# Altium PCB FPC.PcbDoc
Units mm, origin at the board's own origin, x right, y up, seen from the top; angles counter-clockwise.
Board outline 110.11 x 81 mm, 2 copper layers (Top Layer, Bottom Layer), stack 0.086 mm thick; 10 components, 19 nets, 40 pads, 4 vias.
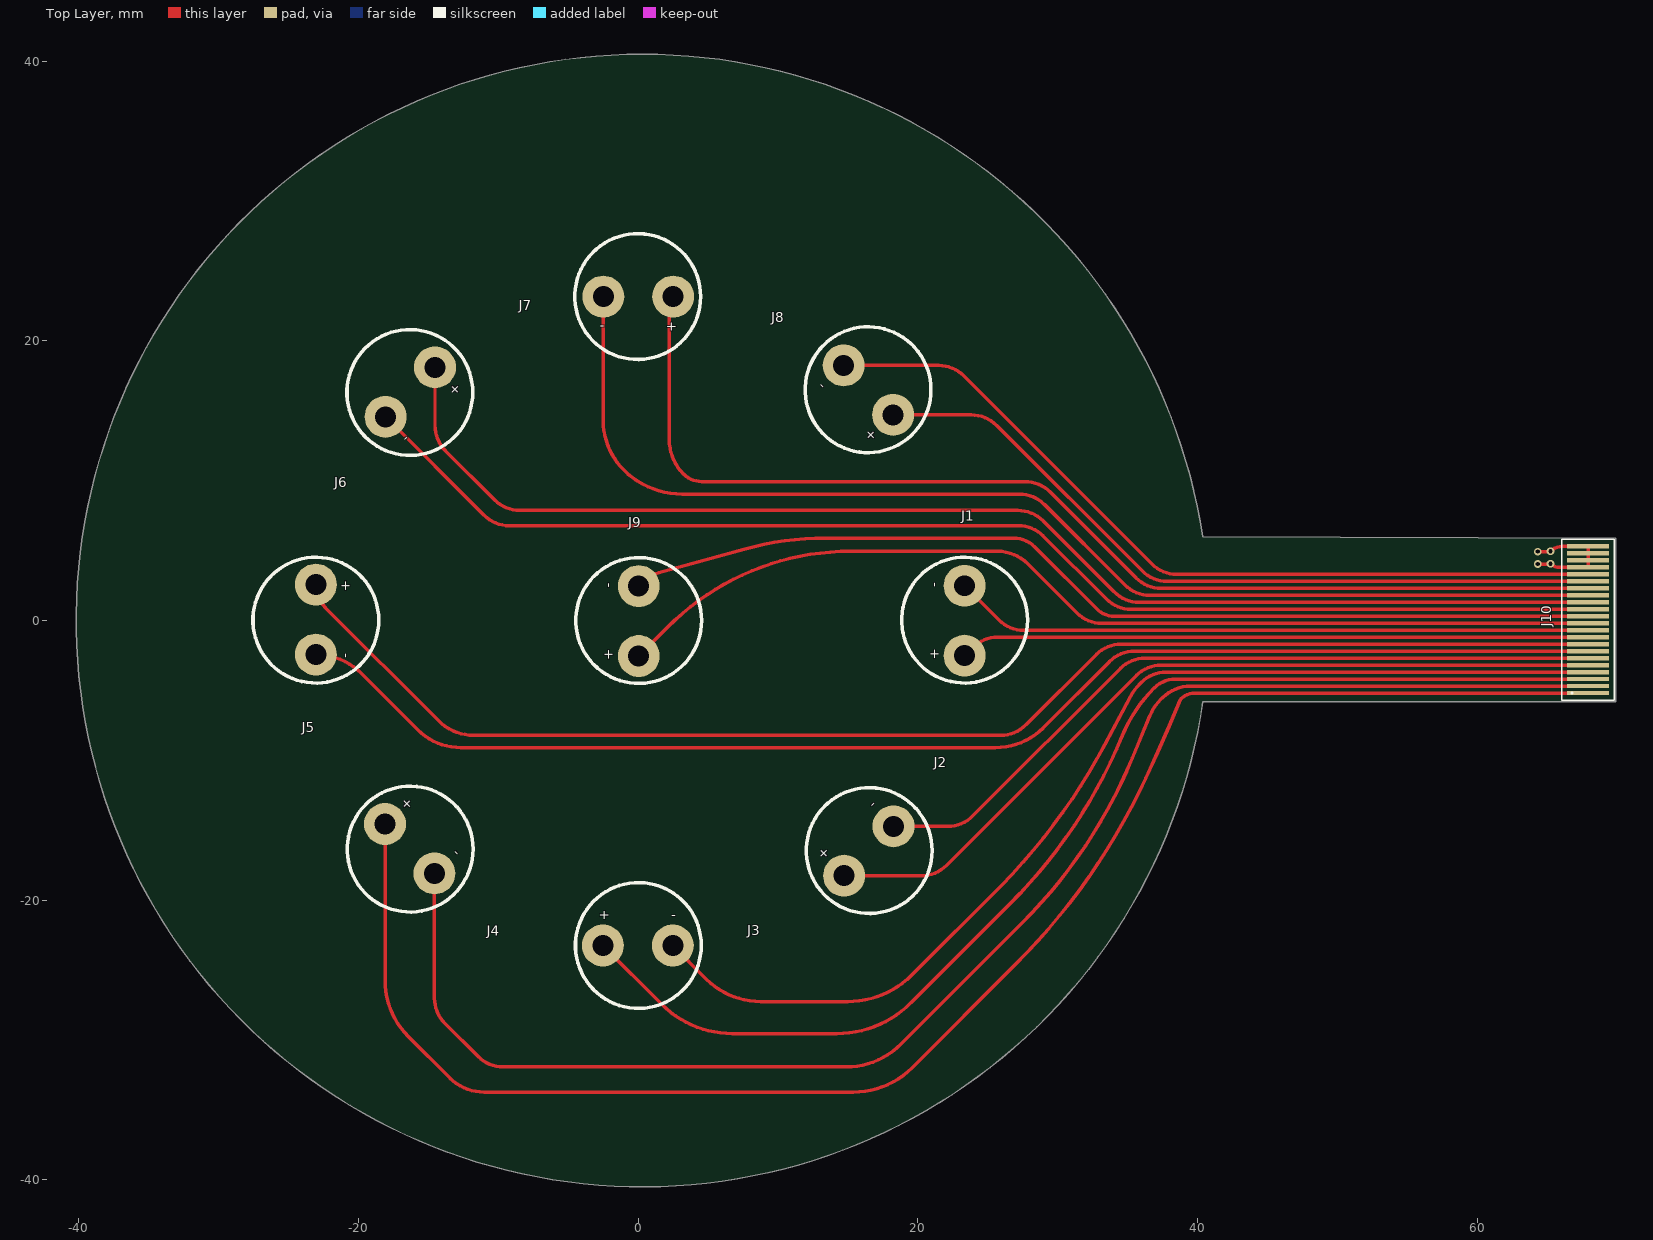
[diagram p0: Top Layer view]
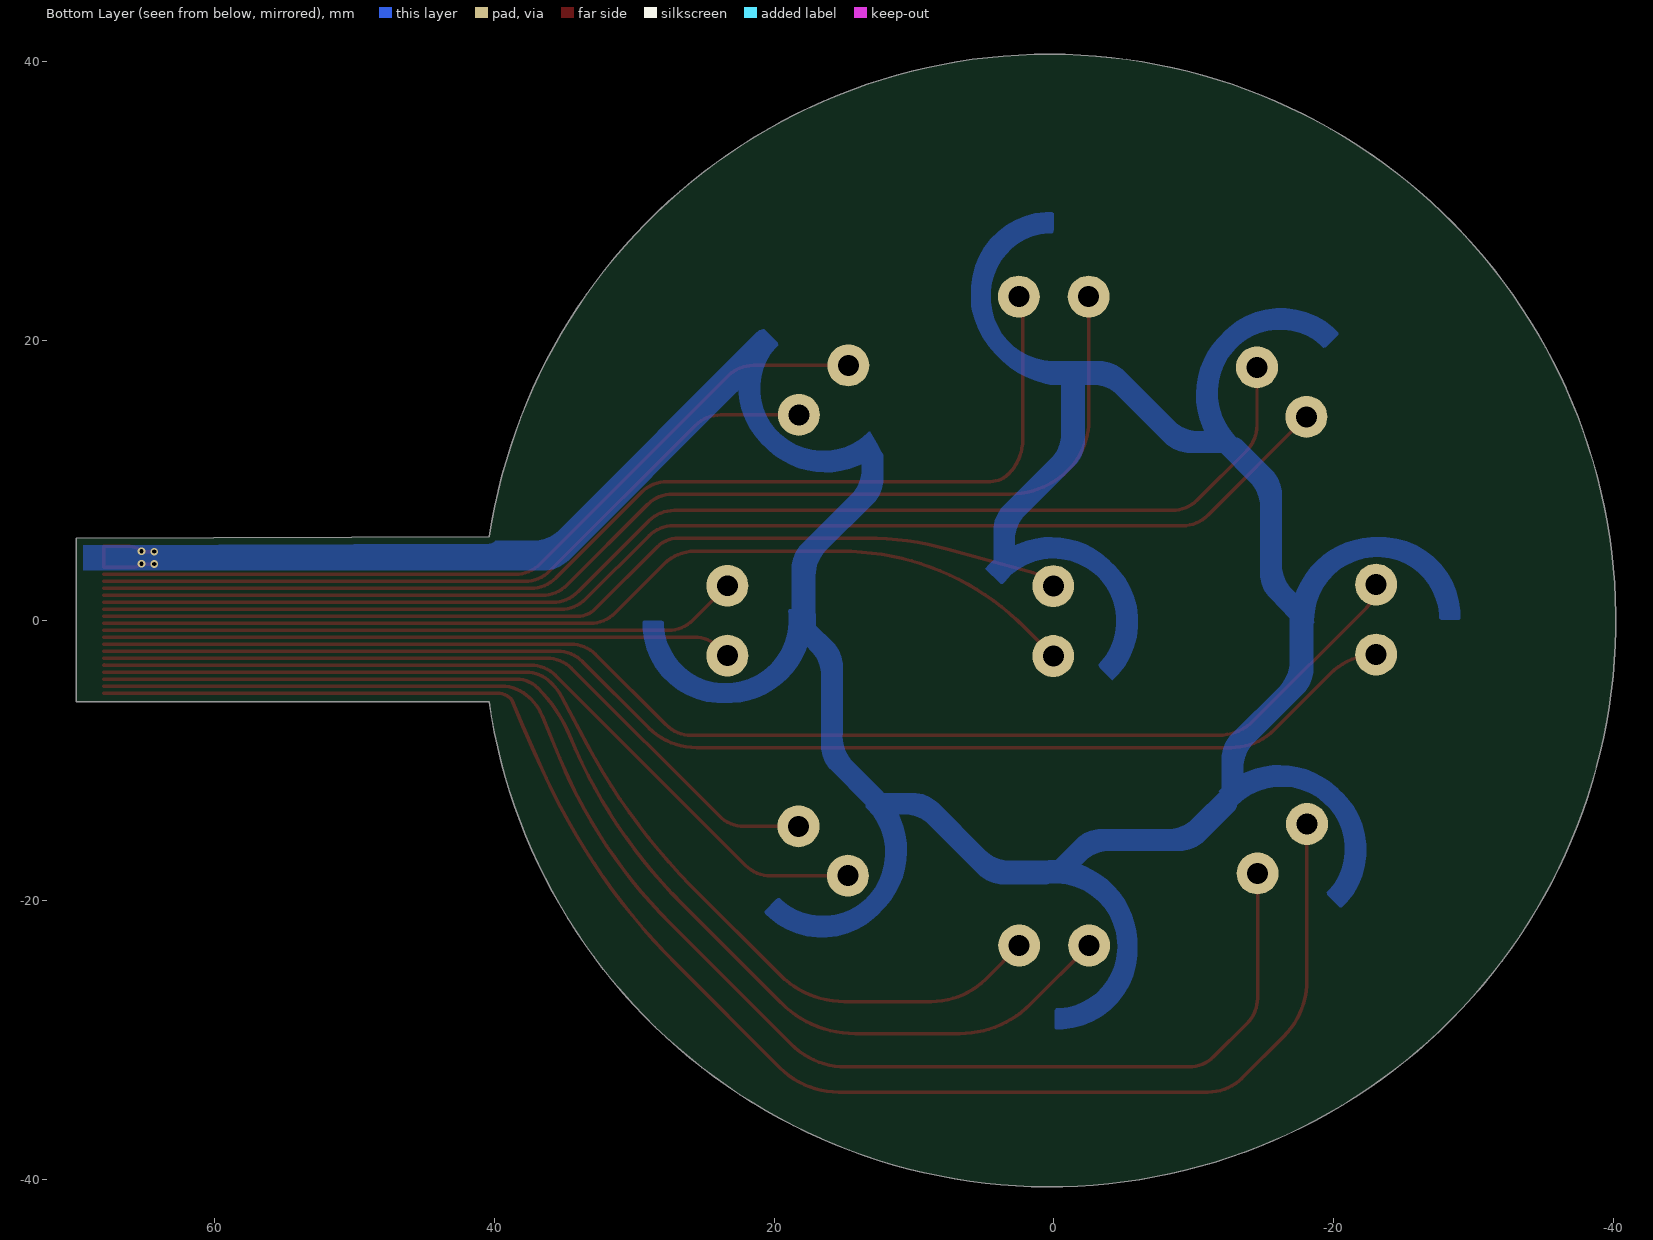
[diagram p1: Bottom Layer view, seen from below]

## Layer stack, top to bottom
Top Coverlay: solder mask 0.05, PI 25um + adhesivo 25um, Dk 3.5
Top Layer: signal copper 0.018
Dielectric 1: core 0.05, Polyimide, Dk 3.4
Bottom Layer: signal copper 0.018
Bottom Coverlay: solder mask 0.05, PI 25um + adhesivo 25um, Dk 3.5

## Board outline
40.399,-5.804 cw(c0.318,0) 40.372,5.99 69.926,5.898 69.926,-5.804

## Design rules (kind name [scope] priority, off if disabled: settings)
BoardOutlineClearance [All] p1: gap=0.5 ignorepadtopadclearanceinfootprint=FALSE
Clearance [All] p1: gap=0.254 ignorepadtopadclearanceinfootprint=FALSE except(0.076: Arc-Arc Arc-Track Track-Track; 0.127: Arc-SMDPad Arc-Via Track-SMDPad Track-Via SMDPad-Via; 0.152: SMDPad-SMDPad; 0.203: Arc-Fill Arc-Poly Arc-Region Track-Fill Track-Poly Track-Region Via-Fill Via-Poly Via-Region Fill-Fill Fill-Poly Fill-Region Poly-Poly Poly-Region Region-Region; 0.25: Via-Via; 0.3: SMDPad-Fill SMDPad-Poly SMDPad-Region THPad-Fill THPad-Poly THPad-Region; 0.35: SMDPad-THPad THPad-THPad THPad-Via THPad-Text THPad-Hole)
HoleSize [All] p1: absolutevalues=TRUE maxlimit=0.55 minlimit=0.3 maxpercent=80.000 minpercent=20.000
MinimumSolderMaskSliver [All] p1: minsoldermaskwidth=0.1
PolygonConnect [All] p1: thpad.connectstyle=Relief thpad.reliefconductorwidth=0.35 thpad.reliefentries=4 thpad.polygonreliefangle="90 Angle" thpad.airgapwidth=0.35 smdpad.connectstyle=Relief smdpad.reliefconductorwidth=0.3 smdpad.reliefentries=4 smdpad.polygonreliefangle="90 Angle" smdpad.airgapwidth=0.3 via.connectstyle=Direct via.reliefconductorwidth=0.254 via.reliefentries=4 via.polygonreliefangle="90 Angle" via.airgapwidth=0.254
RoutingVias [All] p1: holewidth=0.711 width=1.27 viastyle="Through Hole" minholewidth=0.711 minwidth=1.27 maxholewidth=0.711 maxwidth=1.27
SilkToSolderMaskClearance [IsPad] p1: minsilkscreentomaskgap=0.15 clearancetoexposedcopper=TRUE
SolderMaskExpansion [All] p1: expansion=0.076 istentingtop=FALSE
Width [All] p1: maxlimit=1 minlimit=0.1 preferedwidth=0.25 minimp=50.000000 maximp=50.000000 favimp=50.000000
27 further rules are at their usual default settings.

## Components (designator, comment, footprint, x,y, rotation, side; value= is the part's Value field where it differs from the comment)
J1 "Pad" PCBComponent_1 23.355,-2.515 r90 top locked
J2 "Pad" PCBComponent_1 14.736,-18.252 r45 top locked
J3 "Pad" PCBComponent_1 -2.515,-23.241 r0 top locked
J4 "Pad" PCBComponent_1 -18.095,-14.553 r315 top locked
J5 "Pad" PCBComponent_1 -23.039,2.565 r270 top locked
J6 "Pad" PCBComponent_1 -14.52,18.105 r225 top locked
J7 "Pad" PCBComponent_1 2.515,23.165 r180 top locked
J8 "Pad" PCBComponent_1 18.243,14.709 r135 top locked
J9 "Pad" PCBComponent_1 0.05,-2.54 r90 top locked
J10 "2-2492104-2" 324921046 69.532,-5.436 r90 top locked

## Footprints (in the part's own frame and the unit in brackets; to place one, negate y for a bottom-side part, rotate by r counter-clockwise, add the part's x,y. Pads: shape width x height; smd on the part's side, far side on the other; paste and mask are expansions set on the pad)
324921046 [mm]
  rect 0.3x3 smd: 1(0.242,1.592) 2(0.742,1.592) 3(1.242,1.592) 4(1.742,1.592) 5(2.242,1.592) 6(2.742,1.592) 7(3.242,1.592) 8(3.742,1.592) 9(4.242,1.592) 10(4.742,1.592) 11(5.242,1.592) 12(5.742,1.592) 13(6.242,1.592) 14(6.742,1.592) 15(7.242,1.592) 16(7.742,1.592) 17(8.242,1.592) 18(8.742,1.592) 19(9.242,1.592) 20(9.742,1.592) 21(10.242,1.592) 22(10.742,1.592)
  silkscreen extent -0.28,-0.28 11.25,3.45
PCBComponent_1 [mm]
  round 3 hole 1.5: 1(0,0) 2(5,0)
  Top Layer pour cut-out: 13.208,-6.858
  silkscreen extent -1.96,-4.5 7.04,4.5, body extent -1.49,-1.5 6.5,1.5, height 9

## Part data
J10: ".5 mm [.02 in] Centerline, Zero Insertion Force (ZIF), Right Angle, Surface Mount, Stuffer Actuator, Gold Flash, 36 Position, FPC Connectors", Manufacturer_Name="TE Connectivity", Manufacturer_Part_Number=3-2492104-6, Datasheet Link=https://www.te.com/commerce/DocumentDelivery/DDEController?Action=srchrtrv&DocNm=2492104&DocType=Customer%20Drawing&DocLang=English&DocFormat=pdf&PartCntxt=3-2492104-6, Geometry.Height=2.25mm

## Via types
v1: diameter 0.55, hole 0.3, Top Layer to Bottom Layer, 4 vias

## Nets (pads, with @x,y where several pads share a name; then routed paths per layer and width w, separated by ;. In a path a pad name is that pad's centre, name@x,y a point inside that pad or via, vN(x,y) a via of type N, cw(c..) or ccw(c..) an arc to the next point about the centre after c; other vN are vias at no path point)
GND: J10.19 J10.20 J10.21 J10.22 | length 8.9
  Top Layer w0.25: v1(64.338,4.039) 65.191,4.039 ccw(c65.191,4.125) v1(65.253,4.064) ccw(c65.875,4.687) 65.875,3.806 J10.19 J10.20 J10.21 J10.22 66.105,5.306 ccw(c66.105,4.101) v1(65.253,4.953) cw(c65.191,5.014) 65.191,4.928 v1(64.338,4.928)
Signal1+: J1.1 J10.9 | length 45
  Top Layer w0.25: J1.1 23.932,-1.938 cw(c25.728,-3.734) 25.728,-1.194 J10.9
Signal1-: J1.2 J10.10 | length 45.8
  Top Layer w0.25: J1.2 25.791,0.05 ccw(c27.587,1.846) 27.587,-0.694 J10.10
Signal2+: J2.1 J10.5 | length 59.2
  Top Layer w0.25: J2.1 20.269,-18.252 ccw(c20.269,-15.712) 22.065,-17.508 35.635,-3.938 cw(c37.431,-5.734) 37.431,-3.194 J10.5 J10.5@67.926,-3.18
Signal2-: J2.2 J10.6 | length 54.4
  Top Layer w0.25: J2.2 22.154,-14.716 ccw(c22.154,-12.176) 23.95,-13.972 34.484,-3.438 cw(c36.28,-5.234) 36.28,-2.694 J10.6
Signal3+: J3.1 J10.3 | length 84.8
  Top Layer w0.25: J3.1 1.691,-27.446 1.692,-27.448 ccw(c6.744,-22.396) 6.744,-29.54 6.745,-29.54 14.217,-29.54 14.219,-29.54 ccw(c14.219,-22.046) 19.518,-27.345 26.592,-20.271 ccw(c0.362,5.962) 34.633,-8.241 34.634,-8.236 cw(c44.351,-12.263) 36.915,-4.824 cw(c38.438,-6.349) 38.438,-4.194 J10.3
Signal3-: J3.2 J10.4 | length 77.9
  Top Layer w0.25: J3.2 4.889,-25.645 4.891,-25.647 ccw(c8.772,-21.766) 8.772,-27.254 8.774,-27.254 14.982,-27.254 14.984,-27.254 ccw(c14.984,-20.749) 19.585,-25.348 25.965,-18.968 ccw(c-5.186,11.688) 33.374,-8.886 35.215,-5.436 cw(c38.654,-7.269) 35.899,-4.512 35.973,-4.438 cw(c37.77,-6.234) 37.77,-3.694 J10.4
Signal4+: J4.1 J10.1 | length 115.9
  Top Layer w0.25: J4.1 -18.095,-25.713 -18.095,-25.714 ccw(c-12.378,-25.714) -16.42,-29.757 -16.419,-29.758 -13.466,-32.711 -13.464,-32.713 ccw(c-11.006,-30.254) -11.006,-33.731 -11.004,-33.731 15.383,-33.731 ccw(c15.384,-27.763) 19.605,-31.982 26.988,-24.599 ccw(c-5.992,8.408) 36.327,-11.245 ccw(c-96.006,50.215) 38.777,-5.669 38.797,-5.621 cw(c39.828,-6.652) 39.828,-5.194 J10.1
Signal4-: J4.2 J10.2 | length 107.2
  Top Layer w0.25: J4.2 -14.559,-27.01 ccw(c-12.019,-27.01) -13.815,-28.806 -11.437,-31.184 ccw(c-9.641,-29.388) -9.641,-31.928 -5.369,-31.928 -5.367,-31.928 14.879,-31.928 14.88,-31.928 ccw(c14.88,-26.399) 18.791,-30.308 27.447,-21.652 ccw(c1.712,4.121) 35.361,-9.816 36.604,-6.815 36.605,-6.812 cw(c39.957,-8.202) 37.392,-5.635 37.487,-5.541 cw(c39.537,-7.589) 39.537,-4.691 39.912,-4.691 39.914,-4.693 39.945,-4.693 39.946,-4.694 39.948,-4.694 J10.2
Signal5+: J5.1 J10.8 | length 98.2
  Top Layer w0.25: J5.1 ccw(c-20.713,2.565) -22.358,0.92 -14.263,-7.175 -14.261,-7.177 ccw(c-11.78,-4.696) -11.78,-8.204 -11.779,-8.204 25.948,-8.204 ccw(c25.948,-5.664) 27.744,-7.46 32.766,-2.438 cw(c34.563,-4.234) 34.563,-1.694 J10.8
Signal5-: J5.2 J10.7 | length 95.9
  Top Layer w0.25: J5.2 cw(c-23.039,-7.028) -19.792,-3.779 -19.79,-3.781 -15.756,-7.815 -15.754,-7.817 ccw(c-12.673,-4.735) -12.673,-9.093 -12.671,-9.093 25.563,-9.093 ccw(c25.564,-4.278) 28.97,-7.682 33.714,-2.938 cw(c35.51,-4.734) 35.51,-2.194 J10.7
Signal6+: J6.1 J10.14 | length 92
  Top Layer w0.25: J6.1 -14.52,13.946 ccw(c-11.98,13.946) -13.776,12.15 -10.244,8.618 ccw(c-8.447,10.414) -8.447,7.874 27.167,7.874 cw(c27.167,5.334) 28.963,7.13 34.043,2.05 ccw(c35.84,3.846) 35.84,1.306 J10.14
Signal6-: J6.2 J10.13 | length 91.4
  Top Layer w0.25: J6.2 -11.012,7.526 ccw(c-9.216,9.322) -9.216,6.782 27.193,6.782 cw(c27.193,4.242) 28.989,6.038 33.477,1.55 ccw(c35.273,3.346) 35.273,0.806 J10.13
Signal7+: J7.1 J10.16 | length 80.8
  Top Layer w0.25: 2.235,12.933 ccw(c5.718,12.933) 3.256,10.47 ccw(c4.557,11.773) 4.557,9.931 27.675,9.931 cw(c27.675,7.391) 29.471,9.187 35.609,3.05 ccw(c37.405,4.846) 37.405,2.306 J10.16 ; 2.235,12.934 2.235,22.49 cw(c3.189,22.49) J7.1
Signal7-: J7.2 J10.15 | length 85
  Top Layer w0.25: J7.2 -2.485,14.283 -2.485,14.282 ccw(c2.476,14.282) -1.032,10.773 ccw(c3.146,14.952) 3.146,9.042 3.148,9.042 27.269,9.042 cw(c27.269,6.502) 29.065,8.298 34.813,2.55 ccw(c36.61,4.346) 36.61,1.806 J10.15
Signal8+: J8.1 J10.17 | length 54.4
  Top Layer w0.25: J8.1 23.838,14.709 cw(c23.838,12.169) 25.634,13.965 36.049,3.55 ccw(c37.845,5.346) 37.845,2.806 J10.17
Signal8-: J8.2 J10.18 | length 59.2
  Top Layer w0.25: J8.2 21.496,18.244 cw(c21.496,15.704) 23.292,17.5 36.742,4.05 ccw(c38.539,5.846) 38.539,3.306 J10.18
Signal9+: J9.1 J10.11 | length 72.1
  Top Layer w0.25: J9.1 2.122,-0.468 cw(c15.208,-13.552) 15.208,4.953 25.707,4.953 cw(c25.707,1.893) 27.871,4.057 31.378,0.55 ccw(c33.174,2.346) 33.174,-0.194 J10.11
Signal9-: J9.2 J10.12 | length 70.6
  Top Layer w0.25: J9.2 0.351,2.761 cw(c2.147,0.965) 1.471,3.414 7.593,5.104 ; 7.594,5.104 cw(c13.414,-15.975) 13.417,5.893 25.85,5.893 26.848,5.893 cw(c26.848,3.747) 28.365,5.264 28.367,5.263 28.372,5.258 32.797,0.833 ccw(c34.071,2.11) 34.071,0.306 J10.12

## Polygon pours and split planes (outlines as drawn)
no net on Top Layer "GND" (solid, pour order 3): -4.521,-23.114
no net on Top Layer "GND" (solid, pour order 1): -4.521,-23.114
no net on Top Layer "GND" (solid, pour order 0): -4.318,-21.996
no net on Bottom Layer "GND" (solid, pour order 19): 22.225,18.72
GND on Bottom Layer "GND" (solid, pour order 15): 69.73,5.583 ccw(c69.482,5.335) 69.482,5.686 69.327,5.686 ccw(c69.291,5.506) 69.291,5.69 37.222,5.69 cw(c37.222,8.23) 35.426,6.434 21.247,20.612 ccw(c20.721,20.086) 20.721,20.83 19.823,19.932 ccw(c20.056,19.699) 19.726,19.698 cw(c16.616,16.588) 19.726,13.477 19.697,13.448 cw(c16.5,16.645) 13.18,13.576 ccw(c50.011,-8.186) 12.219,11.861 12.219,10.16 ccw(c14.759,10.16) 12.963,8.364 16.321,5.007 cw(c14.526,3.211) 17.065,3.211 17.065,0.406 18.745,0.406 18.745,3.685 ccw(c16.206,3.685) 18.001,5.481 14.48,9.002 cw(c16.276,10.798) 13.736,10.798 13.742,11.188 ccw(c16.339,16.591) 20.577,12.352 20.883,12.658 ccw(c16.878,16.663) 22.539,16.496 34.71,4.325 ccw(c36.506,6.121) 36.506,3.581 69.427,3.581 ccw(c69.427,3.928) 69.672,3.683 ccw(c69.488,3.867) 69.748,3.867 69.748,5.309 69.748,5.493 ccw(c69.513,5.493)
GND on Bottom Layer "GND" (solid, pour order 9): 0.292,16.855 ccw(c-1.117,23.893) 5.918,22.471 5.918,23.546 ccw(c0.254,23.546) 0.254,29.21 0.025,29.21 0.025,27.94 ccw(c0.355,27.94) 0.122,27.707 cw(c0.122,23.308) 4.521,23.307 4.521,23.074 cw(c0,23.074) -0.178,18.556 -0.178,16.854 ccw(c0.029,28.449)
GND on Bottom Layer "GND" (solid, pour order 18): -0.523,16.857 -2.204,16.857 -2.204,12.876 ccw(c0.336,12.876) -1.46,11.08 2.061,7.559 cw(c0.266,5.763) 2.805,5.762 2.8,5.372 ccw(c0.203,-0.03) -4.036,4.208 -4.341,3.903 ccw(c-0.336,-0.102) -4.341,-4.107 -4.18,-4.269 -3.282,-3.371 ccw(c-3.514,-3.138) -3.185,-3.137 cw(c-0.074,-0.027) -3.185,3.084 -3.156,3.113 cw(c0.041,-0.084) 3.731,2.528 4.897,3.694 ccw(c0.366,0.136) 4.322,4.325 4.322,6.401 ccw(c1.783,6.401) 3.578,8.197 0.221,11.554 cw(c2.017,13.35) -0.523,13.35
GND on Bottom Layer "GND" (solid, pour order 8): -12.24,12.011 -9.731,12.011 ccw(c-9.731,14.551) -7.935,12.755 -4.578,16.113 cw(c-2.782,14.317) -2.782,16.857 0.292,16.857 0.292,18.039 ccw(c-0.207,18.039) -0.207,18.537 -3.256,18.537 ccw(c-3.256,15.997) -5.052,17.793 -8.574,14.272 cw(c-10.37,16.068) -10.37,13.528 -10.76,13.534 ccw(c-16.162,16.131) -11.924,20.369 -12.229,20.675 ccw(c-16.234,16.67) -20.239,20.675 -20.401,20.513 -19.503,19.615 ccw(c-19.27,19.848) -19.269,19.518 cw(c-16.159,16.408) -13.048,19.518 -13.019,19.489 cw(c-16.216,16.292) -13.175,12.947
GND on Bottom Layer "GND" (solid, pour order 7): -16.857,0.148 -15.501,1.584 ccw(c-17.297,3.38) -14.757,3.38 -14.757,8.128 cw(c-12.217,8.128) -14.013,9.924 -11.84,12.097 -12.676,12.933 ccw(c-13.029,12.581) -13.381,12.933 -15.537,10.777 ccw(c-13.741,8.981) -16.281,8.981 -16.281,4.001 cw(c-18.821,4.001) -17.025,2.205 -17.305,1.933 ccw(c-22.961,-0.051) -22.962,5.944 -23.393,5.944 ccw(c-23.394,0.28) -29.058,0.279 -29.058,0.051 -27.788,0.051 ccw(c-27.788,0.381) -27.554,0.148 cw(c-23.155,0.148) -23.155,4.547 -23.114,4.547 cw(c-23.114,0.026) -18.603,-0.279 -16.972,-0.279 ccw(c-23.164,1.622)
GND on Bottom Layer "GND" (solid, pour order 6): -12.011,-11.985 -12.011,-9.909 ccw(c-14.551,-9.909) -12.755,-8.113 -16.113,-4.756 cw(c-14.317,-2.96) -16.857,-2.96 -16.857,0.114 -18.039,0.114 ccw(c-18.039,-0.384) -18.537,-0.384 -18.537,-3.434 ccw(c-15.997,-3.434) -17.793,-5.23 -14.272,-8.751 cw(c-16.068,-10.547) -13.528,-10.547 -13.534,-10.937 ccw(c-16.131,-16.34) -20.369,-12.101 -20.675,-12.407 ccw(c-16.67,-16.412) -20.675,-20.417 -20.513,-20.579 -19.615,-19.681 ccw(c-19.848,-19.447) -19.518,-19.447 cw(c-16.408,-16.337) -19.518,-13.226 -19.489,-13.197 cw(c-16.292,-16.394) -12.923,-13.38 -11.77,-12.227 ccw(c-15.948,-16.152)
GND on Bottom Layer "GND" (solid, pour order 4): -0.116,-17.147 -1.584,-15.679 ccw(c-3.38,-17.475) -3.38,-14.935 -8.128,-14.935 cw(c-8.128,-12.395) -9.924,-14.191 -12.097,-12.018 -12.933,-12.854 ccw(c-12.581,-13.206) -12.933,-13.559 -10.777,-15.715 ccw(c-8.981,-13.919) -8.981,-16.459 -4.001,-16.459 cw(c-4.001,-18.999) -2.205,-17.203 -1.933,-17.483 ccw(c0.051,-23.139) -5.944,-23.139 -5.944,-23.571 ccw(c-0.28,-23.571) -0.279,-29.235 -0.051,-29.235 -0.051,-27.965 ccw(c-0.381,-27.965) -0.148,-27.732 cw(c-0.148,-23.333) -4.547,-23.333 -4.547,-23.292 cw(c-0.026,-23.292) 0.737,-18.835 0.737,-17.186 ccw(c0.047,-22.938)
GND on Bottom Layer "GND" (solid, pour order 17): 12.163,-12.342 10.087,-12.342 ccw(c10.087,-14.881) 8.291,-13.086 4.933,-16.443 cw(c3.137,-14.647) 3.137,-17.187 0.064,-17.187 0.064,-18.369 ccw(c0.562,-18.369) 0.562,-18.868 3.612,-18.868 ccw(c3.612,-16.328) 5.408,-18.124 8.929,-14.602 cw(c10.725,-16.398) 10.725,-13.858 11.115,-13.864 ccw(c16.518,-16.461) 12.279,-20.7 12.585,-21.005 ccw(c16.59,-17) 20.595,-21.005 20.757,-20.843 19.859,-19.945 ccw(c19.625,-20.178) 19.625,-19.848 cw(c16.514,-16.738) 13.404,-19.848 13.375,-19.819 cw(c16.572,-16.622) 13.558,-13.253 12.405,-12.1 ccw(c16.33,-16.279)
GND on Bottom Layer "GND" (solid, pour order 16): 12.326,-12.177 14.542,-9.962 ccw(c12.552,-8.33) 15.113,-8.077 15.113,-3.329 cw(c17.653,-3.329) 15.857,-1.533 17.027,-0.363 cw(c24.837,-0.142) 17.08,0.787 19.013,0.787 ccw(c23.469,0.025) 23.47,-4.496 23.511,-4.496 ccw(c23.511,-0.097) 27.91,-0.097 cw(c28.143,-0.33) 28.143,0 29.413,0 29.413,-0.229 cw(c23.749,-0.229) 23.749,-5.893 23.317,-5.893 cw(c23.317,0.101) 17.661,-1.882 17.381,-2.154 ccw(c19.177,-3.95) 16.637,-3.95 16.637,-8.93 cw(c14.097,-8.93) 15.893,-10.726 13.456,-13.163 cw(c13.384,-13.091) 13.312,-13.163

## Silkscreen, mask and mechanical layers (free items; w line width, h text height)
Mechanical 1:
  lines w0.076: -6.071,-23.139 ccw(c-6.009,-23.078) -6.009,-23.165
  lines w0.254: 40.372,5.99 ccw(c0.318,0) 40.399,-5.804 69.926,-5.804 69.926,5.898 40.372,5.99
Stiffener_PI_Bottom:
  region: 63.873,-5.804 69.926,-5.804 69.926,5.898 63.873,5.917
  text "PI STIFFENER 0.15mm - BOTTOM SIDE - FINGERS 0.30mm" at 58.372,8.53 h1.2
Stiffener_FR4_Bottom:
  drawing of 9 lines, arcs and shapes, not listed
  text "FR4 STIFFENER 0.4mm - BOTTOM SIDE - HOLES D1.7mm" at -40.628,43.53 h1.2

## Text inside footprints (layer, text, board x,y; h text height)
J1: Top Overlay "-" at 21.473,2.384 h0.7 r90; Top Overlay "+" at 21.494,-2.823 h0.7 r90
J2: Top Overlay "+" at 13.202,-17.153 h0.7 r45; Top Overlay "-" at 16.869,-13.457 h0.7 r45
J3: Top Overlay "+" at -2.823,-21.38 h0.7; Top Overlay "-" at 2.384,-21.359 h0.7
J4: Top Overlay "+" at -16.996,-13.02 h0.7 r315; Top Overlay "-" at -13.3,-16.687 h0.7 r315
J5: Top Overlay "+" at -21.178,2.873 h0.7 r270; Top Overlay "-" at -21.157,-2.334 h0.7 r270
J6: Top Overlay "+" at -12.986,17.006 h0.7 r225; Top Overlay "-" at -16.653,13.31 h0.7 r225
J7: Top Overlay "+" at 2.823,21.303 h0.7 r180; Top Overlay "-" at -2.384,21.283 h0.7 r180
J8: Top Overlay "+" at 17.144,13.175 h0.7 r135; Top Overlay "-" at 13.448,16.842 h0.7 r135
J9: Top Overlay "+" at -1.812,-2.848 h0.7 r90; Top Overlay "-" at -1.832,2.359 h0.7 r90